# Altium PCB AudioMoth-v1.2.PcbDoc (part 4 of 4)
Units mil, origin at the board's own origin, x right, y up, seen from the top; angles counter-clockwise.
Board outline 4924.42 x 1891.72 mil, 4 copper layers (Top Layer, Layer 1, Layer 2, Bottom Layer), stack 61.651 mil thick; 148 components, 140 nets, 637 pads, 349 vias.
Unrouted connection lines stored in the file: 32.
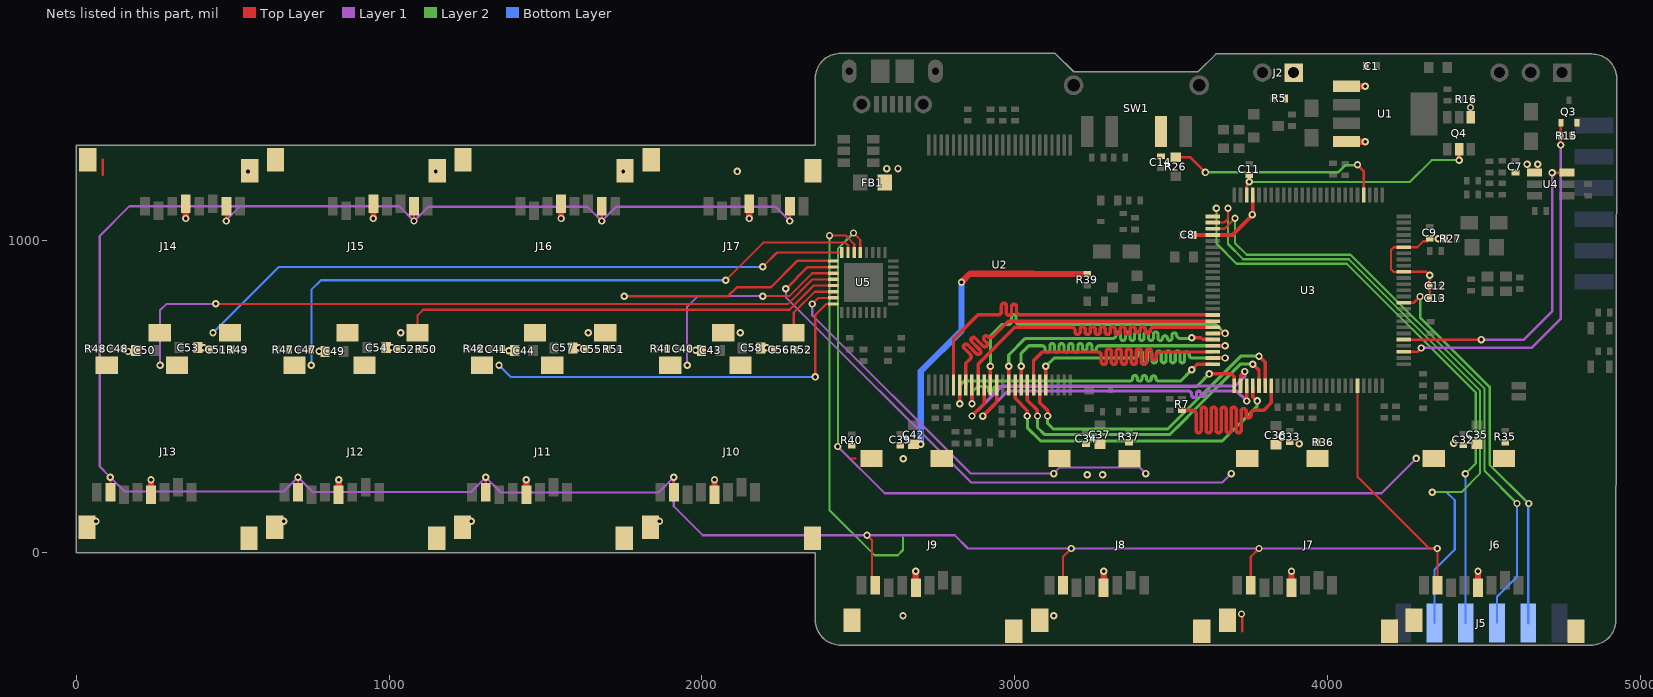
[diagram p5: the nets of this part, all layers, seen from the top]

## Via types
v1: diameter 23.62, hole 11.81, Top Layer to Bottom Layer, tented both sides, 344 vias
v2: diameter 23.62, hole 11.81, Top Layer to Bottom Layer, 5 vias

## Nets (pads, with @x,y where several pads share a name; then routed paths per layer and width w, separated by ;. In a path a pad name is that pad's centre, name@x,y a point inside that pad or via, vN(x,y) a via of type N, cw(c..) or ccw(c..) an arc to the next point about the centre after c; other vN are vias at no path point) (continued)
SD-PWR: C32.2 C33.2 C34.2 C35.2 C36.2 C37.2 C39.2 C40.2 C41.2 C42.2 C43.2 C44.2 C47.2 C48.2 C49.2 C50.2 C51.2 C52.2 C53.2 C54.2 C55.2 C56.2 C57.2 C58.2 J6.4 J7.4 J8.4 J9.4 J10.4 J11.4 J12.4 J13.4 J14.4 J15.4 J16.4 J17.4 R39.1 | length 1645.8
  Top Layer w20: J13.4@238.63,181.27 J13.4@238.63,186.5 v1(238.63,234.41) ; v1(349.68,1069.2) J14.4@349.68,1117.12 J14.4@349.68,1122.35 ; J12.4@838.63,181.27 J12.4@838.63,186.5 v1(838.63,234.41) ; v1(949.68,1069.2) J15.4@949.68,1117.12 J15.4@949.68,1122.35 ; J11.4@1438.63,180.59 1438.63,181.27 J11.4@1438.63,186.5 v1(1438.63,234.41) ; v1(1549.68,1069.2) J16.4@1549.68,1117.12 J16.4@1549.68,1122.35 ; J10.4@2040.08,180.59 2040.08,181.27 J10.4@2040.08,186.5 v1(2040.08,234.41) ; v1(2151.14,1069.2) J17.4@2151.14,1117.12 J17.4@2151.14,1122.35 ; C42.2@2676.87,347.78 v1@2699.03,347.78 ; J9.4@2683.87,-111.1 v1(2683.87,-57.95) ; v1(2829.9,865.31) 2856.9,892.31 3059.44,892.31 ; 3059.67,892.08 R39.1@3232.04,892.08 ; J8.4@3284.3,-111.1 v1(3284.3,-57.95) ; J7.4@3884.74,-111.1 v1(3884.74,-57.95) ; J6.4@4481.2,-111.1 v1(4481.2,-57.95)
  Bottom Layer w20: v1@2699.91,347.78 2699.91,580.7 2829.9,710.69 v1(2829.9,865.31)
  other v1: 3231.44,250.31 3280.9,250.31 2700.03,347.78 3910.02,349.24 4403.9,351.31 165.74,644.19 775.87,644.78 1382.18,646.94 1979.64,647.94 1606.14,655.78 2207.59,655.77 407.38,656.39 1009.19,656.78
SD_CD_1: J6.9 J6.10 R35.2 U5.13 | length 2731.6
  Top Layer w7: v1(2484.6,1022.88) 2506.4,1001.07 U5.13@2506.4,960.65
  Layer 1 w7: v1(2434.66,340.42) 2584.08,191 4172.63,191 v1(4283.91,302.29)
  Layer 2 w7: v1(2434.66,340.42) 2434.66,972.94 v1(2484.6,1022.88)
SD_CD_2: J9.9 J9.10 R40.2 U5.14 | length 1351
  Top Layer w7: v1(2408,1014.73) 2459.48,1014.73 2486.72,987.49 U5.14@2486.72,960.65 ; 2478.87,302.29 2491.37,302.29
  Layer 2 w7: v1(2408,1014.73) 2408,137.02 2552.45,-7.43 2626.22,-7.43 2642.86,9.21 2642.86,51.54
  other v1: 2642.85,-200.4 2643.86,300.82
SD_CD_3: J12.9 J12.10 R47.2 U5.15 | length 2045.9
  Top Layer w7: v1(2076.29,872.16) 2196.32,992.19 2458.02,992.19 2466.75,983.46 2466.75,960.93 U5.15@2467.03,960.65
  Bottom Layer w7: v1(751.31,599.88) 751.31,841.31 782.16,872.16 v1(2076.29,872.16)
  other v1: 662.75,101.23
SD_CD_4: J14.9 J14.10 R49.2 U5.16 | length 2164.3
  Top Layer w7: v1(2194.29,914.64) 2240.31,960.65 U5.16@2447.35,960.65
  Top Layer w8: 83.87,1256.88 84.87,1255.88 84.87,1209.78
  Bottom Layer w7: v1(437,703.73) 647.9,914.64 v1(2194.29,914.64)
  other v1: 548.9,1219.84
SD_CD_5: J16.9 J16.10 R51.2 U5.17 | length 724.4
  Top Layer w8: v1(1751.27,821.19) 2084,821.19 2112.43,849.63 2220.4,849.63 2304.46,933.68 U5.17@2429.09,933.68
  other v1: 1637,703.73 1748.9,1219.84
SD_CD_6: J7.9 J7.10 R36.2 U5.18 | length 1945.7
  Top Layer w8: v1(2268.45,844.51) 2337.93,914 U5.18@2420.38,914 ; v1@3725.87,-195.22 v1(3724.87,-195.22) 3727.26,-197.62 3727.26,-250.86
  Layer 1 w7: v1(2268.45,844.51) 2268.45,817.75 2860.43,225.78 3664.24,225.78 v1(3692.24,253.78)
SD_CD_7: J10.9 J10.10 R41.2 U5.19 | length 699.2
  Top Layer w7: v1(2194.29,821.19) 2279.35,821.19 2352.47,894.31 U5.19@2420.38,894.31
  Layer 1 w7: v1(1952.77,599.88) 1952.77,787.02 1986.94,821.19 v1(2194.29,821.19)
  other v1: 1864.21,101.23
SD_CD_8: J13.9 J13.10 R48.2 U5.20 | length 2369.4
  Top Layer w7: v1(445.87,796.47) 2275.5,796.47 2353.65,874.63 U5.20@2420.38,874.63
  Layer 1 w7: v1(267.68,599.88) 267.68,775.58 288.56,796.47 v1(445.87,796.47)
  other v1: 62.75,101.23
SD_CD_9: J15.9 J15.10 R50.2 U5.21 | length 1424.9
  Top Layer w7: J15.10@1091.02,703.73 1091.02,759.93 1108.87,777.78 2279.96,777.78 2357.13,854.94 U5.21@2420.38,854.94
  other v1: 1037,703.73 1148.9,1219.84
SD_CD_10: J17.9 J17.10 R52.2 U5.22 | length 226.3
  Top Layer w7: J17.10@2293.7,696.6 2293.7,768.6 2360.36,835.26 U5.22@2420.38,835.26
  other v1: 2122.09,703.73 2112.9,1219.84
SD_CD_11: J8.9 J8.10 R37.2 U5.23 | length 1403.1
  Top Layer w7: v1(2352.91,795.89) 2372.6,815.57 U5.23@2420.38,815.57
  Layer 1 w7: v1(2352.91,795.89) 2352.91,760.29 2859.43,253.78 v1(3124.43,253.78) 3144.28,273.62 3398.69,273.62 v1(3418.54,253.78)
  other v1: 3124.43,-200.4
SD_CD_12: J11.9 J11.10 R42.2 U5.24 | length 1297.2
  Top Layer w7: v1(2362.19,562.78) 2362.19,761.09 2396.98,795.89 U5.24@2420.38,795.89
  Bottom Layer w7: v1(1351.31,599.88) 1388.42,562.78 v1(2362.19,562.78)
  other v1: 1262.75,101.23
SD_CPU_MISO: J6.7 J7.7 J8.7 J9.7 J10.7 J11.7 J12.7 J13.7 J14.7 J15.7 J16.7 J17.7 U3.21 | length 9277.3
  Top Layer w7: J13.7@108.71,194.37 v1(108.71,242.29) ; v1(479.6,1061.32) J14.7@479.6,1109.24 ; J12.7@708.71,194.37 v1(708.71,242.29) ; v1(1079.6,1061.32) J15.7@1079.6,1109.24 ; J11.7@1308.71,194.37 v1(1308.71,242.29) ; v1(1679.6,1061.32) J16.7@1679.6,1109.24 ; J10.7@1910.16,194.37 v1(1910.16,242.29) ; v1(2281.06,1061.32) J17.7@2281.06,1109.24 ; v1(2527.9,56.78) 2543.28,41.39 2543.28,-92.56 J9.7@2553.95,-103.22 ; J8.7@3154.38,-103.22 3154.38,-11.74 v1@3186.28,20.16 ; J7.7@3754.82,-103.22 3754.82,-11.77 v1(3780.9,14.31) ; U3.21@4095.96,534.6 4095.96,243.32 4324.98,14.31 v1(4351.28,14.31) J6.7@4351.28,-103.22
  Layer 1 w7: v1(479.6,1061.32) 479.6,1064.24 523.94,1108.57 ; v1(2281.06,1061.32) 2235.27,1107.12 1725.4,1107.12 v1(1679.6,1061.32) 1633.81,1107.12 1125.4,1107.12 v1(1079.6,1061.32) 1032.35,1108.57 523.94,1108.57 ; v1@4349.28,14.31 v1(3780.9,14.31) v1(3180.43,14.31) 2850.47,14.31 2808,56.78 v1(2527.9,56.78) 2002.47,56.78 1910.16,149.09 v1(1910.16,242.29) 1861.46,193.58 1357.41,193.58 v1(1308.71,242.29) 1261.46,195.04 755.96,195.04 v1(708.71,242.29) 662.91,196.49 154.5,196.49 v1(108.71,242.29) 74.66,276.34 74.66,1013.66 169.57,1108.57 523.94,1108.57
SRAM_CPU_D0: U2.29 U3.92 | length 1124.2
  Top Layer w11: U2.29@2804.23,536.92 2804.23,682.64 2882.57,760.98 2941.13,760.98 2946.63,760.98 ccw(c2946.63,771.98) 2957.63,771.98 2957.63,790.49 cw(c2965.63,790.49) 2973.63,790.49 2973.63,767.29 ccw(c2981.63,767.29) 2989.63,767.29 2989.63,787.26 cw(c2997.63,787.26) 3005.63,787.26 3005.63,771.98 ccw(c3016.63,771.98) 3016.63,760.98 3065.65,760.98 U3.92@3633.37,760.98
SRAM_CPU_D1: U2.31 U3.93 | length 1124.2
  Top Layer w11: U2.31@2843.6,536.92 2843.6,606.13 2853.4,615.93 2857.29,619.82 ccw(c2849.51,627.6) 2857.29,635.38 2838.37,654.3 cw(c2844.02,659.96) 2838.37,665.62 cw(c2844.02,659.96) 2849.68,665.62 2877.8,637.5 ccw(c2883.45,643.16) 2889.11,637.5 ccw(c2883.45,643.16) 2889.11,648.81 2862.41,675.51 cw(c2868.07,681.17) 2862.41,686.82 cw(c2868.07,681.17) 2873.73,686.82 2899.01,661.54 ccw(c2904.67,667.2) 2910.32,661.54 ccw(c2904.67,667.2) 2910.32,672.85 2902.54,680.63 cw(c2908.2,686.29) 2902.54,691.95 cw(c2908.2,686.29) 2913.86,691.95 ccw(c2921.64,699.72) 2929.42,691.95 2967.77,730.31 2978.76,741.29 U3.93@3633.37,741.29
SRAM_CPU_D2: U2.33 U3.94 | length 1124.2
  Top Layer w11: U2.33@2882.97,536.92 2882.97,604.16 3000.42,721.61 3160.61,721.61 3182.11,721.61 cw(c3182.11,710.61) 3193.11,710.61 3193.11,706.59 ccw(c3201.11,706.59) 3209.11,706.59 3209.11,715.29 cw(c3217.11,715.29) 3225.11,715.29 3225.11,706.59 ccw(c3233.11,706.59) 3241.11,706.59 3241.11,715.29 cw(c3249.11,715.29) 3257.11,715.29 3257.11,706.59 ccw(c3265.11,706.59) 3273.11,706.59 3273.11,715.29 cw(c3281.11,715.29) 3289.11,715.29 3289.11,706.59 ccw(c3297.11,706.59) 3305.11,706.59 3305.11,715.29 cw(c3313.11,715.29) 3321.11,715.29 3321.11,706.59 ccw(c3329.11,706.59) 3337.11,706.59 3337.11,715.29 cw(c3345.11,715.29) 3353.11,715.29 3353.11,706.59 ccw(c3361.11,706.59) 3369.11,706.59 3369.11,715.29 cw(c3377.11,715.29) 3385.11,715.29 3385.11,713.33 ccw(c3393.11,713.33) 3401.11,713.33 3401.11,715.29 cw(c3409.11,715.29) 3417.11,715.29 3417.11,710.61 ccw(c3425.11,710.61) 3433.11,710.61 cw(c3444.11,710.61) 3444.11,721.61 3538.36,721.61 U3.94@3633.37,721.61
SRAM_CPU_D3: U2.35 U3.95 | length 1022.2
  Top Layer w11: U2.35@2922.34,536.92 v1(2922.34,596.5) ; U3.95@3633.37,701.92 v1(3672.51,701.92)
  Layer 2 w9.9: v1(2922.34,596.5) 2922.34,694.84 2957.8,730.31 2974.91,730.31 2979.86,730.31 ccw(c2979.86,740.21) 2989.76,740.21 2989.76,754.57 cw(c2997.21,754.57) 3004.66,754.57 3004.66,740.21 ccw(c3014.56,740.21) 3014.56,730.31 3054.46,730.31 3644.13,730.31 v1(3672.51,701.92)
SRAM_CPU_D4: U2.38 U3.96 | length 1019.2
  Top Layer w11: U2.38@2981.4,536.92 v1(2981.4,596.5) ; v1(3565.9,688.14) 3595.21,688.14 3600.71,682.64 3632.96,682.64 U3.96@3633.37,682.24
  Layer 2 w9.9: v1@2980.9,596.5 2980.9,633.04 3034.17,686.31 3309.08,686.31 3314.03,686.31 ccw(c3314.03,696.21) 3323.93,696.21 3323.93,699.25 cw(c3331.38,699.25) 3338.83,699.25 3338.83,686.9 ccw(c3346.28,686.9) 3353.73,686.9 3353.73,699.25 cw(c3361.18,699.25) 3368.63,699.25 3368.63,686.9 ccw(c3376.08,686.9) 3383.53,686.9 3383.53,699.25 cw(c3390.98,699.25) 3398.43,699.25 3398.43,686.9 ccw(c3405.88,686.9) 3413.33,686.9 3413.33,699.25 cw(c3420.78,699.25) 3428.23,699.25 3428.23,686.9 ccw(c3435.68,686.9) 3443.13,686.9 3443.13,699.22 cw(c3450.58,699.22) 3458.03,699.22 3458.03,686.9 ccw(c3465.48,686.9) 3472.93,686.9 cw(c3480.38,686.9) 3487.83,686.9 ccw(c3495.28,686.9) 3502.73,686.9 3502.73,696.21 cw(c3510.18,696.21) 3517.63,696.21 ccw(c3527.53,696.21) 3527.53,686.31 3556.75,686.31 3564.07,686.31 v1(3565.9,688.14)
SRAM_CPU_D5: U2.40 U3.97 | length 1022.2
  Top Layer w11: U2.40@3020.77,536.92 v1(3020.77,596.5) ; U3.97@3633.37,662.55 v1(3672.51,662.55)
  Layer 2 w9.9: v1@3020.72,596.5 3020.72,638.22 3045.05,662.55 3067.7,662.55 3087.55,662.55 cw(c3087.55,652.65) 3097.45,652.65 3097.45,649.35 ccw(c3104.9,649.35) 3112.35,649.35 3112.35,661.96 cw(c3119.8,661.96) 3127.25,661.96 3127.25,649.35 ccw(c3134.7,649.35) 3142.15,649.35 3142.15,661.96 cw(c3149.6,661.96) 3157.05,661.96 3157.05,649.35 ccw(c3164.5,649.35) 3171.95,649.35 3171.95,661.96 cw(c3179.4,661.96) 3186.85,661.96 3186.85,649.35 ccw(c3194.3,649.35) 3201.75,649.35 3201.75,661.96 cw(c3209.2,661.96) 3216.65,661.96 3216.65,654.92 ccw(c3224.1,654.92) 3231.55,654.92 3231.55,661.96 cw(c3239,661.96) 3246.45,661.96 3246.45,652.65 ccw(c3253.9,652.65) 3261.35,652.65 cw(c3271.25,652.65) 3271.25,662.55 3324.77,662.55 v1(3672.51,662.55)
SRAM_CPU_D6: U2.42 U3.98 | length 1124.4
  Top Layer w11: U2.42@3060.14,536.92 3060.14,614.55 3088.05,642.46 3244.54,642.46 3266.04,642.46 cw(c3266.04,631.46) 3277.04,631.46 3277.04,610.74 ccw(c3285.04,610.74) 3293.04,610.74 3293.04,644.46 cw(c3301.04,644.46) 3309.04,644.46 3309.04,610.74 ccw(c3317.04,610.74) 3325.04,610.74 3325.04,644.46 cw(c3333.04,644.46) 3341.04,644.46 3341.04,610.74 ccw(c3349.04,610.74) 3357.04,610.74 3357.04,644.46 cw(c3365.04,644.46) 3373.04,644.46 3373.04,610.74 ccw(c3381.04,610.74) 3389.04,610.74 3389.04,644.46 cw(c3397.04,644.46) 3405.04,644.46 3405.04,610.74 ccw(c3413.04,610.74) 3421.04,610.74 3421.04,644.46 cw(c3429.04,644.46) 3437.04,644.46 3437.04,625.69 ccw(c3445.04,625.69) 3453.04,625.69 3453.04,631.46 cw(c3464.04,631.46) 3464.04,642.46 3624.21,642.46 3632.96,642.46 U3.98@3633.37,642.87
SRAM_CPU_D7: U2.44 U3.99 | length 1022.2
  Top Layer w11: U2.44@3099.51,536.92 v1(3099.51,596.5) ; U3.99@3633.37,623.18 v1(3672.51,623.18)
  Layer 2 w9.9: v1(3099.51,596.5) 3126.2,623.18 3379.12,623.18 3384.08,623.18 ccw(c3384.08,633.08) 3393.98,633.08 3393.98,638.2 cw(c3401.43,638.2) 3408.88,638.2 3408.88,615.28 ccw(c3416.33,615.28) 3423.78,615.28 3423.78,638.2 cw(c3431.23,638.2) 3438.68,638.2 3438.68,615.28 ccw(c3446.13,615.28) 3453.58,615.28 3453.58,638.2 cw(c3461.03,638.2) 3468.48,638.2 3468.48,615.28 ccw(c3475.93,615.28) 3483.38,615.28 3483.38,638.2 cw(c3490.83,638.2) 3498.28,638.2 3498.28,615.28 ccw(c3505.73,615.28) 3513.18,615.28 3513.18,638.2 cw(c3520.63,638.2) 3528.08,638.2 3528.08,615.28 ccw(c3535.53,615.28) 3542.98,615.28 3542.98,635.79 cw(c3550.43,635.79) 3557.88,635.79 3557.88,633.08 ccw(c3567.78,633.08) 3567.78,623.18 3662.3,623.18 v1(3672.51,623.18)
SRAM_CPU_D8: U2.30 U3.100 | length 1022.2
  Top Layer w11: v1(2823.92,477.35) U2.30@2823.92,536.92 ; v1(3565.9,585.31) 3565.9,586.31 3583.09,603.5 U3.100@3633.37,603.5
  Layer 2 w9.9: v1(2823.92,477.35) 2823.92,535.14 2837.98,549.19 2843.6,549.19 2922.34,549.19 3362.07,549.19 3367.02,549.19 ccw(c3367.02,559.09) 3376.92,559.09 3376.92,559.98 cw(c3384.37,559.98) 3391.82,559.98 3391.82,556.64 ccw(c3399.27,556.64) 3406.72,556.64 3406.72,559.65 cw(c3414.17,559.65) 3421.62,559.65 3421.62,556.64 ccw(c3429.07,556.64) 3436.52,556.64 3436.52,559.09 cw(c3443.97,559.09) 3451.42,559.09 ccw(c3461.32,559.09) 3461.32,549.19 3510.18,549.19 3529.78,549.19 v1(3565.9,585.31)
SRAM_CPU_D9: U2.32 U3.1 | length 1023.3
  Top Layer w11: v1(2863.29,477.35) U2.32@2863.29,536.92 ; v1(3622.05,572.46) 3692.61,572.46 3702.26,562.81 U3.1@3702.26,534.6
  Layer 2 w9.9: v1(2863.29,477.35) 2863.29,514.56 2881.02,532.29 2886.88,532.29 2906.73,532.29 cw(c2906.73,522.39) 2916.63,522.39 2916.63,518.91 ccw(c2924.08,518.91) 2931.53,518.91 2931.53,522.39 cw(c2941.43,522.39) 2941.43,532.29 2967.19,532.29 3581.88,532.29 v1@3625.31,575.72
SRAM_CPU_D10: U2.34 U3.2 | length 1107.2
  Top Layer w11: v1(2863.29,437.89) 2902.66,477.26 U2.34@2902.66,536.92 ; U3.2@3721.95,534.6 3721.95,566.33 v1(3735.73,580.11)
  Layer 1 w9.9: v1(2863.29,437.89) 2897.41,472.01 2958.68,533.29 2959.68,534.28 3705.77,534.28 3735.73,564.25 v1(3735.73,580.11)
SRAM_CPU_D11: U2.36 U3.3 | length 1105.7
  Top Layer w11: v1(2897.41,437.63) 2897.15,437.89 2942.03,482.78 U2.36@2942.03,536.92 ; v1(3741.4,485.92) 3741.52,486.03 3741.52,534.48 U3.3@3741.63,534.6
  Layer 1 w9.9: v1(2897.41,437.63) 2977.16,517.38 3536.06,517.38 3555.91,517.38 cw(c3555.91,507.48) 3565.81,507.48 3565.81,504.01 ccw(c3573.26,504.01) 3580.71,504.01 3580.71,509.93 cw(c3588.16,509.93) 3595.61,509.93 3595.61,507.48 ccw(c3603.06,507.48) 3610.51,507.48 cw(c3620.41,507.48) 3620.41,517.38 3689.9,517.38 3710.33,517.38 3741.4,486.31 v1(3741.4,485.92)
SRAM_CPU_D12: U2.39 U3.4 | length 1022.2
  Top Layer w11: U2.39@3001.08,536.92 3001.08,494.48 3040.45,455.11 v1(3040.45,437.89) ; U3.4@3761.32,534.6 3761.32,499.86 v1(3775.1,486.08)
  Layer 2 w9.9: v1(3040.45,437.89) 3040.45,400.19 3082.33,358.31 3664.45,358.31 3775.1,468.96 v1(3775.1,486.08)
SRAM_CPU_D13: U2.41 U3.5 | length 1016.9
  Top Layer w11: U2.41@3040.45,536.92 3040.45,488.2 3072.74,455.92 v1(3072.74,437.89) ; v1(3761.32,603.5) 3781,583.81 U3.5@3781,534.6
  Layer 2 w9.9: v1(3072.74,437.89) 3072.74,401.38 3094.8,379.31 3496.5,379.31 3535.13,417.93 3572.75,455.56 3721.07,603.87 3760.94,603.87 v1(3761.32,603.5)
SRAM_CPU_D14: U2.43 U3.6 | length 1015.3
  Top Layer w11: U2.43@3079.82,536.92 3079.82,480.61 3105.02,455.41 v1(3105.02,437.89) ; v1(3780.99,629.24) 3780.99,628.79 3800.69,609.09 U3.6@3800.69,534.6
  Layer 2 w9.9: v1(3105.02,437.89) 3105.02,414.35 3122.59,396.78 3490.07,396.78 3722.53,629.24 v1(3780.99,629.24)
SRAM_CPU_D15: R7.1 U3.7 | length 1124.2
  Top Layer w11: R7.1@3534.9,456.31 3547.25,456.31 3568.75,456.31 cw(c3568.75,445.31) 3579.75,445.31 3579.75,392.28 ccw(c3587.75,392.28) 3595.75,392.28 3595.75,458.31 cw(c3603.75,458.31) 3611.75,458.31 3611.75,392.28 ccw(c3619.75,392.28) 3627.75,392.28 3627.75,458.31 cw(c3635.75,458.31) 3643.75,458.31 3643.75,392.28 ccw(c3651.75,392.28) 3659.75,392.28 3659.75,458.31 cw(c3667.75,458.31) 3675.75,458.31 3675.75,392.28 ccw(c3683.75,392.28) 3691.75,392.28 3691.75,458.31 cw(c3699.75,458.31) 3707.75,458.31 3707.75,392.28 ccw(c3715.75,392.28) 3723.75,392.28 3723.75,453.61 cw(c3731.75,453.61) 3739.75,453.61 3739.75,440.16 ccw(c3747.75,440.16) 3755.75,440.16 3755.75,445.31 cw(c3766.75,445.31) 3766.75,456.31 3796.86,456.31 3820.37,479.83 U3.7@3820.37,534.6
SWCLK: J5.3 U3.76 | length 1889.9
  Layer 2 w7: v1(3644.9,1101.72) 3644.9,989.31 3709.33,924.87 4061.92,924.87 4473.9,512.9 4473.9,286.31 v1(4440.9,253.31)
  Bottom Layer w7: v1(4440.9,253.31) 4440.9,-223.25 J5.3@4441.87,-224.22
SWDIO: J5.2 U3.77 | length 2145.5
  Top Layer w7: U3.77@3633.37,1056.25 3669.84,1056.25 3681.87,1068.28 v1(3681.87,1101.72)
  Layer 2 w7: v1(3681.87,1101.72) 3681.87,987.87 3730.87,938.87 4067.72,938.87 4487.9,518.69 4487.9,254.4 4428.12,194.62 4335.83,194.62 v1(4334.9,194.62)
  Bottom Layer w7: v1(4334.9,194.62) 4380.59,194.62 4406.84,168.36 4406.84,11.25 4341.87,-53.72 J5.2@4341.87,-224.22
SWI_CPU_RST: J5.5 U3.36 | length 1249.8
  Top Layer w8: U3.36@4243.15,800.8 U3.36@4243.6,800.35 4276.21,800.35 v1(4295.89,820.03)
  Layer 2 w8: v1(4295.89,820.03) 4295.89,753.31 4518.03,531.18 4518.03,282.15 v1@4642.38,157.79
  Bottom Layer w8: J5.5@4641.87,-224.22 4641.87,157.28 v1(4642.9,158.31)
SWO: J5.4 U3.78 | length 1973.6
  Top Layer w7: U3.78@3633.37,1036.57 3670.72,1036.57 v1(3704.18,1070.03)
  Layer 2 w7: v1(3704.18,1070.03) 3704.18,990.44 3741.41,953.21 4073.66,953.21 4502.24,524.63 4502.24,261.97 v1(4605.9,158.31)
  Bottom Layer w7: J5.4@4541.87,-224.22 4541.87,-140.38 4605.9,-76.35 v1(4605.9,158.31)
USB_ENABLE: C14.2 R26.2 SW1.2 U3.54 | length 715.2
  Top Layer w8: R26.2@3514.87,1264.81 3561.58,1264.81 v1(3609.74,1216.64) ; v1(4095.96,1240.83) 4115.65,1221.15 U3.54@4115.65,1144.84
  Layer 2 w8: v1(3609.74,1216.64) 4033.74,1216.64 4056.87,1239.78 4094.91,1239.78 v1(4095.96,1240.83)
VBAT: C1.2 J2.1 R5.2 U1.1 U1.4 | length 120.3
  Top Layer w20: U1.4@4060.46,1314.9 v1(4120.59,1314.9) ; U1.1@4060.46,1492.06 v1(4120.59,1492.06)
VBUS: C8.2 FB1.1 Q4.1 R16.1 U3.72 U3.79 | length 279.8
  Top Layer w12: C8.2@3571.4,1016.89 U3.79@3633.37,1016.88 3696.36,1016.88 3761.32,1081.84 U3.72@3761.32,1144.84
  other v1: 3759.32,1081.84 2591.31,1228.95 2626.75,1228.95 4457.15,1424.35
VDD: C7.2 C9.2 C12.2 C13.2 Q3.2 R15.1 R27.2 U3.41 U3.45 U4.4 | length 407.2
  Top Layer w7: U3.41@4243.6,898.77 4211.07,898.77 4202.7,907.14 4202.7,968.57 4211.65,977.51 U3.45@4243.6,977.51
  Top Layer w8: U3.41@4243.6,898.77 4315.77,898.77 v1(4327,887.54) ; U3.45@4243.6,977.51 4286.88,977.51 4305.99,996.62 4318.55,996.62 C9.2@4327,1005.07 ; C13.2@4327,814.94 C12.2@4327,854.31 v1@4327,888.89
  other v1: 4354.6,1005.07 4637.99,1242.78 4672.33,1242.78
VMIC_EN_N: Q3.1 R15.2 U3.28 | length 1172.7
  Top Layer w8: U3.28@4243.6,642.87 4287.46,642.87 v1(4299.92,655.32) ; v1(4746.02,1304.31) R15.2@4746.02,1334.11 Q3.1@4746.02,1375.55
  Layer 1 w8: v1(4299.92,655.32) 4651.92,655.32 4746.02,749.43 v1(4746.02,1304.31)
VREF_EN: U3.30 U4.3 | length 1002.2
  Top Layer w8: U3.30@4243.6,682.24 v1(4491.92,682.24) ; v1(4717.9,1215.31) 4718.97,1216.38 U4.3@4765.15,1216.38
  Layer 1 w8: v1(4491.92,682.24) 4627.61,682.24 4717.9,772.52 v1(4717.9,1215.31)
VREGO: C11.2 Q4.5 U3.73 | length 801.8
  Top Layer w8: U3.73@3741.63,1144.84 3741.63,1174.04 v1@3751.9,1184.31 ; C11.2@3747.54,1207.81 3749.79,1205.55 v1(3749.79,1186.41)
  Top Layer w12: v1(4420.62,1255.22) Q4.5@4420.62,1291
  Layer 2 w7: v1(3749.79,1186.41) 4263.77,1186.41 4333.32,1255.96 4419.88,1255.96 v1(4420.62,1255.22)
pads on no net: D1.3 D1.4 J3.4 J3.SH1 J3.SH2 J3.SH3 J3.SH4 J3.SH5 J3.SH6 J6.1 J6.8 J7.1 J7.8 J8.1 J8.8 J9.1 J9.8 J10.1 J10.8 J11.1 J11.8 J12.1 J12.8 J13.1 J13.8 J14.1 J14.8 J15.1 J15.8 J16.1 J16.8 J17.1 J17.8 SW1.4 SW1.5 SW1.6 U1.2 U2.10 U2.13 U3.80 X1.2 X1.3

## Polygon pours and split planes (outlines as drawn)
3V on Layer 2 "3V_L03_P024" (solid, remove dead copper, pour order 24): 2362.1,411 2663.45,411 2663.45,470.08 3020.72,470.08 3020.72,327.24 3820.37,327.24 3820.37,507.21 4316.08,507.21 4316.08,850.59 4717.9,850.59 4717.9,1294.95 4521.62,1294.95 4521.62,1595.27 4844.78,1595.27 cw(c4844.79,1518.87) 4921.18,1518.87 4921.18,-217.72 cw(c4844.42,-217.73) 4844.42,-294.49 2444.5,-294.49 cw(c2444.49,-212.1) 2362.1,-212.09 2362.1,0 0.4,0 0.4,1294.95 2352.91,1294.95 2352.91,604.75 2105.9,604.75 2105.9,204 2362.1,204
GND on Layer 2 "GND_L03_P025" (solid, remove dead copper, pour order 25): 0.4,0 2362.61,0 2362.61,-215.75 ccw(c2442.92,-214.17) 2444.5,-294.49 4841.65,-294.49 ccw(c4843.03,-216.34) 4921.18,-217.72 4924.31,1518.5 ccw(c4846.16,1517.12) 4844.78,1595.27 3643.32,1595.27 3586.23,1538.18 3188.59,1538.18 3129.53,1597.24 2443.99,1597.24 ccw(c2442.42,1516.92) 2362.1,1518.5 2362.1,1302.76 -0.1,1302.76
VBUS on Layer 2 "VBUS_L03_P020" (solid, remove dead copper, pour order 20): 4512,1069.27 3727.85,1069.27 3727.85,1409.31 2763.53,1409.31 2763.53,1149.31 2362.1,1149.31 2362.1,1518.5 cw(c2440.84,1518.5) 2440.84,1597.24 2455.49,1597.24 3129.53,1597.24 3188.59,1538.18 3586.23,1538.18 3643.32,1595.27 4512,1595.27
VDD on Layer 2 "VDD_L03_P014" (solid, remove dead copper, pour order 14): 4316.08,870.31 4316.08,1054.45 4521.62,1054.45 4521.62,1274.31 4694.81,1274.31 4694.81,870.31
NetD1_5 on Top Layer "NETD1_5_L01_P026" (solid, pour order 26): 2677.93,1349.91 2677.93,1461.41 2652.34,1461.41 2652.34,1372.1 2579.51,1299.27 2539.89,1299.27 2494.74,1299.27 2482.28,1286.81 2482.28,1158.12 2526.54,1158.12 2526.54,1210.09 2514.18,1222.46 2514.18,1260.82 2525.07,1271.71 2599.73,1271.71
GND on Top Layer "GND_L01_P022" (solid, remove dead copper, pour order 22): 4922.92,742.84 4922.92,755.07 4141.24,755.07 4141.24,1271.31 4481.62,1271.31 4481.62,1491.72 4338.09,1491.72 4338.09,1595.27 3643.32,1595.27 3586.23,1538.18 3188.59,1538.18 3129.53,1597.24 2443.99,1597.24 ccw(c2442.41,1516.92) 2362.1,1518.5 2362.1,1302.76 -0.1,1302.76 0.4,0 2362.61,0 2362.61,-215.75 ccw(c2442.92,-214.17) 2444.5,-294.49 4841.65,-294.49 ccw(c4843.03,-216.34) 4921.18,-217.72
AGND on Top Layer "AGND_L01_P019" (solid, remove dead copper, pour order 19): 4499.34,1275.76 4466.36,1242.78 4396.51,1242.78 4370.85,1217.12 4180.64,1217.12 4168.8,1204.9 4168.8,1119.43 4185.9,1102.33 4185.9,1025 4345.09,1025 4345.09,772.31 4916.73,772.31 4916.73,1522.76 ccw(c4837.23,1522.76) 4837.22,1602.27 4350.34,1602.27 4350.34,1519.31 4499.34,1519.31
3V_SRAM on Top Layer "3V_SRAM_L01_P016" (solid, remove dead copper, pour order 16): 2967.22,570.38 2967.22,338.31 2912.16,338.31 2912.16,432.57 2956.2,476.6 2956.2,570.38
GND on Bottom Layer "GND_L04_P021" (solid, remove dead copper, pour order 21): 0.4,0 2362.61,0 2362.61,-215.75 ccw(c2442.92,-214.17) 2444.5,-294.49 4841.65,-294.49 ccw(c4843.03,-216.34) 4921.18,-217.72 4924.31,1518.5 ccw(c4846.16,1517.12) 4844.78,1595.27 3643.32,1595.27 3586.23,1538.18 3188.59,1538.18 3129.53,1597.24 2443.99,1597.24 ccw(c2442.42,1516.92) 2362.1,1518.5 2362.1,1302.76 -0.1,1302.76
SD-PWR on Bottom Layer "SD-PWR_L04_P015" (solid, remove dead copper, pour order 15): 3890.74,364 3807.84,281.09 2805.11,281.09 2691.35,394.85 2296.81,394.85 2296.81,1135.33 2296.58,1138.77 2296.58,1302.76 0.4,1302.76 0.4,0 2362.61,0 2362.61,-294.49 4636.9,-294.49 4636.9,364
3V on Bottom Layer "3V_L04_P017" (solid, remove dead copper, pour order 17): 3188.59,1538.18 3129.53,1597.24 2795.34,1597.24 2795.34,1396.91 3299.9,1396.91 3299.9,873.31 3645.67,873.31 3645.67,968.31 4245.99,968.31 4245.99,691 4922.97,691 4922.97,1595.34 3643.39,1595.34 3586.23,1538.18
GND on Layer 1 "GND_L02_P023" (solid, remove dead copper, pour order 23): 0.4,0 2362.61,0 2362.61,-215.75 ccw(c2442.92,-214.17) 2444.5,-294.49 4841.65,-294.49 ccw(c4843.03,-216.34) 4921.18,-217.72 4924.31,1518.5 ccw(c4846.16,1517.12) 4844.78,1595.27 3643.32,1595.27 3586.23,1538.18 3188.59,1538.18 3129.53,1597.24 2443.99,1597.24 ccw(c2442.42,1516.92) 2362.1,1518.5 2362.1,1302.76 -0.1,1302.76

## Other copper
Top Layer:
  rectangle net VDD: 4588.08,1203.88 4686.02,1225.38
  rectangle net 3V: 4444.24,1271.31 4471.74,1358.29
  rectangle net 3V: 4406.84,1329.81 4471.74,1358.29
  rectangle net 3V: 4406.84,1329.81 4434.4,1413.05
  rectangle net VBUS: 2578.4,1158.12 2628.27,1244.88
  rectangle net VBUS: 2575.58,1208.55 2642.56,1244.88
  rectangle net VBUS: 2561.04,1158.12 2628.27,1210.09
  rectangle net 3V: 4516.74,951.53 4590.35,1003.5
  region net CPU_USB#_D_N: 2473.24,1309.11 2473.24,1336.67 2433.87,1336.67 2433.87,1309.11
  rectangle net SD_CD_6: 3707.97,285.36 4003.24,317.15
  rectangle net SD_CD_2: 2497.41,285.36 2792.69,317.15
  rectangle net NetR12_2: 2798.1,341 2893.16,366
  rectangle net NetFB5_1: 3254.26,1051.56 3286.44,1142.52
  rectangle net NetFB2_2: 3172.74,407.78 3240.81,451.19
  rectangle net NetFB2_2: 3215.81,433.81 3254.06,474.81
  rectangle net INT_EXP: 2624.55,678.6 2649.55,723.02
  region net NetFB5_2: 3373,1142.52 3320.59,1142.52 3320.59,1110.78 3373,1110.78
  rectangle net 3V: 3329.74,1058.34 3396.9,1103.03
  rectangle net CPU_FET_SD_EN_N: 3362.33,787.78 3448.94,830.05
  rectangle net NetFB2_2: 2985.87,368.52 3202.87,394.52
  rectangle net MIC_CPU_DATA: 4614.9,1287.7 4694.26,1371.75
  rectangle net NetC6_1: 4612.91,1382.19 4694.26,1565.3
  rectangle net VDD: 4626.03,1236.88 4819.61,1268.31
  rectangle net NetLED2_1: 4892.82,576.09 4913.63,657.72
  rectangle net NetLED1_1: 4890.84,699.17 4911.66,780.81
  rectangle net VDD: 4311,992.57 4384.86,1017.57
  rectangle net NetFB3_1: 4426.36,950.51 4490.99,1003.5
  region net NetQ4_3: 4434.74,1435.72 4434.74,1463.22 4370.72,1463.22 4370.72,1435.72
  region net NetQ4_3: 4399.22,1373.67 4399.22,1464.22 4369.44,1464.22 4369.44,1373.67
  region net VBUS: 4471.74,1373.67 4471.74,1464.22 4444.24,1464.22 4444.24,1373.67
  region net HFXTAL_CPU_CLK_P: 4441.68,852.81 4441.68,820.97 4531.29,820.97 4531.29,852.81
  region net GND: 4441.68,909 4441.68,866.69 4531.29,866.69 4531.29,909
  rectangle net SWCLK: 3609.74,1070.03 3656.99,1121.21
  rectangle net VDD: 4626.03,1203.88 4686.02,1268.31
  region net GND: 4550.98,852.81 4550.98,820.97 4627.27,820.97 4627.27,852.81
  region net HFXTAL_CPU_CLK_N: 4550.98,899.71 4550.98,866.69 4631.87,866.69 4631.87,899.71
  rectangle net NetFB2_2: 3172.74,368.52 3202.87,451.19
  rectangle net 3V: 2462.87,370.28 2545.63,391.78
  rectangle net VBAT: 3845.96,1440.81 3873.46,1585.07
  rectangle net NetJ4_1: 4717.34,1432.51 4779.42,1565.3
  rectangle net VDD: 4774.02,1242.78 4819.61,1387.36
  rectangle net BAT_ACMP_V: 3803.49,1393.23 3899.37,1411.23
  rectangle net NetQ2_3: 3827.85,1349.09 3903.63,1381.37
  rectangle net VBAT: 3845.96,1474.34 4140.87,1585.07
  rectangle net SD_CD_1: 4766.87,-268.68 4826.87,329.84
  rectangle net SD_CD_7: 1870.96,593.27 1897.97,665.28
  region net SD_CD_5: 1716.87,711.28 1689.86,711.28 1689.86,639.27 1716.87,639.27
  rectangle net SD_CD_12: 1272.31,593.26 1299.33,665.28
  region net SD_CD_9: 1117.88,711.29 1090.87,711.29 1090.87,639.28 1117.88,639.28
  rectangle net SD_CD_3: 662.34,590.87 689.36,662.89
  region net SD_CD_4: 515.27,709.9 488.25,709.9 488.25,637.89 515.27,637.89
  rectangle net SD_CD_8: 61.86,593.17 88.87,665.19
  region net SD-PWR: 204.32,666.01 139.46,666.01 139.46,630.18 204.32,630.18
  rectangle net SD-PWR: 373.38,638.89 438.24,674.71
  region net SD-PWR: 809.87,663.1 742.22,663.1 742.22,627.28 809.87,627.28
  rectangle net SD-PWR: 975.19,639.28 1040.05,675.1
  region net SD-PWR: 1416.18,665.27 1351.32,665.27 1351.32,629.44 1416.18,629.44
  rectangle net SD-PWR: 1572.14,637.46 1636.99,673.28
  region net SD-PWR: 2013.64,665.44 1948.78,665.44 1948.78,629.62 2013.64,629.62
  rectangle net SD-PWR: 2173.59,637.45 2238.45,673.27
  rectangle net SD_CD_10: 2287.52,637.45 2308.37,690.98
  rectangle net SD_CD_9: 831.18,686.81 1126.45,718.6
  rectangle net SD_CD_4: 231.18,686.81 526.45,718.6
  rectangle net SD_CD_5: 1431.18,686.81 1726.45,718.6
  rectangle net SD_CD_10: 2032.64,686.81 2327.91,718.6
  rectangle net NetC45_2: 2456.35,634.6 2649.55,669.1
  region net SD_CD_1: 4826.87,329.84 4528.84,329.84 4528.84,274.73 4826.87,274.73
  rectangle net SD_CD_1: 4252.98,274.26 4575.9,325.78
  rectangle net SD_CD_6: 3661.31,242.75 3778.84,329.84
  region net SD_CD_6: 4034.54,329.84 3932.38,329.84 3932.38,242.75 4034.54,242.75
  region net SD_CD_11: 3449.47,329.84 3331.94,329.84 3331.94,242.75 3449.47,242.75
  rectangle net SD_CD_11: 3060.88,237.31 3178.4,329.84
  region net SD_CD_2: 2849.03,329.84 2731.51,329.84 2731.51,274.73 2849.03,274.73
  rectangle net SD_CD_8: 61.86,582.95 357.13,614.75
  rectangle net SD_CD_3: 661.86,582.95 957.13,614.75
  rectangle net SD_CD_12: 1261.86,582.95 1557.13,614.75
  rectangle net SD_CD_7: 1863.31,582.95 2158.59,614.75
  region net SD_CD_4: 581.57,1286.41 8.74,1286.41 8.74,1184.05 581.57,1184.05
  region net SD_CD_9: 1181.57,1286.41 608.74,1286.41 608.74,1184.05 1181.57,1184.05
  region net SD_CD_5: 1781.57,1286.41 1208.74,1286.41 1208.74,1184.05 1781.57,1184.05
  region net SD_CD_10: 2383.03,1286.41 1810.2,1286.41 1810.2,1184.05 2383.03,1184.05
  rectangle net SD_CD_7: 1808.2,17.2 2381.03,119.57
  rectangle net SD_CD_12: 1206.74,17.2 1779.57,119.57
  rectangle net SD_CD_3: 606.74,17.2 1179.57,119.57
  rectangle net SD_CD_8: 6.74,17.2 579.57,119.57
  rectangle net SD_CD_1: 4253.29,-280.39 4826.12,-178.03
  rectangle net SD_CD_6: 3652.85,-280.39 4225.69,-178.03
  rectangle net SD_CD_11: 3052.42,-280.39 3625.25,-178.03
  rectangle net SD_CD_2: 2451.98,-280.39 3024.81,-178.03
  rectangle net SD-PWR: 4387.11,335.28 4496.92,363.78
  rectangle net BAT_ACMP_V: 3803.49,1405.73 3836.46,1465.81
  rectangle net SD-PWR: 3817.65,331.24 3922.92,363.78
  rectangle net SD-PWR: 3212.31,237.31 3300.03,363.78
  rectangle net SD-PWR: 2618.01,329.78 2711.68,362.78
  rectangle net SD_CD_2: 2460.44,274.73 2491.37,351.28
  rectangle net SD_CD_2: 2460.44,274.73 2577.96,329.84
  rectangle net SD_CD_1: 4529.04,275.26 4580.75,371.78
  rectangle net SD_CD_1: 4532.81,274.26 4603.68,329.38
  rectangle net SD_CD_6: 3932.38,274.73 4003.24,329.84
  rectangle net SD_CD_6: 3932.58,274.73 3983.11,371.24
  rectangle net USB_ENABLE: 3448.11,1249.3 3489.19,1396.91
  rectangle net MODE: 3274.68,1249.3 3331.71,1401.77
  rectangle net USB_ENABLE: 3456.98,1249.81 3532.37,1279.81
  rectangle net NetFB2_1: 3222.56,506.31 3313.74,534.41
  rectangle net SD_CD_11: 3331.94,274.73 3402.81,362.28
  rectangle net 3V: 3323.59,381.28 3390.83,474.81
  rectangle net NetFB4_2: 3212.79,788.8 3244.54,865.31
  region net NetFB4_1: 3334.52,787.78 3334.52,864.92 3275.35,864.92 3275.35,787.78
  rectangle net 3V: 3345.1,839.66 3448.11,985.62
  pour cut-out: 4608,1573.35 4608,1271.04 4818,1271.04 4818,1573.35
  pour cut-out: 4420.62,1202.4 4420.62,1126.47 4466.14,1126.47 4466.14,1202.4
  pour cut-out: 4345.09,1085 4345.09,875.69 4590.35,875.69 4590.35,1085
  pour cut-out: 4644.37,909 4644.37,807.77 4387.11,807.77 4387.11,938.14 4644.37,938.14
Layer 1:
  rectangle net VBAT: 4101.86,1297.18 4143.05,1514.78
  pour cut-out: 4491.9,1588.31 4491.9,1470.31 4796.9,1470.31 4796.9,1588.39
Layer 2:
  rectangle net SD_CD_2: 2631.05,-214 2656.58,312.14
  rectangle net SD_CD_11: 3110.86,-215.43 3135.74,274.73
  rectangle net SD_CD_6: 3679.55,-215.43 3738.32,270.6
  region net SD_CD_10: 2129.04,1235 2097.5,1235 2097.5,687.98 2129.04,687.98
  region net SD_CD_10: 2135.9,739.69 2097.5,739.69 2097.5,687.94 2135.9,687.94
  region net SD_CD_4: 571.73,1244 521.73,1244 521.73,687.94 571.73,687.94
  region net SD_CD_4: 571.73,739.69 418.9,739.69 418.9,687.94 571.73,687.94
  region net SD_CD_9: 1171.73,1241 1121.73,1241 1121.73,687.94 1171.73,687.94
  region net SD_CD_9: 1171.73,739.69 1023.9,739.69 1023.9,687.94 1171.73,687.94
  region net SD_CD_5: 1771.73,1242 1721.73,1242 1721.73,687.94 1771.73,687.94
  region net SD_CD_5: 1771.73,739.69 1625.9,739.69 1625.9,687.94 1771.73,687.94
  rectangle net SD_CD_8: 45.96,85.62 75.77,615.67
  rectangle net SD_CD_8: 45.96,581 286.27,615.67
  rectangle net SD_CD_3: 636.58,82 686.58,615.67
  rectangle net SD_CD_3: 636.58,581.85 775.87,615.67
  rectangle net SD_CD_12: 1236.58,82.17 1286.58,615.67
  rectangle net SD_CD_12: 1237,581.18 1363.9,615.67
  rectangle net SD_CD_7: 1839,582 1970.9,615.67
  rectangle net SD_CD_7: 1838.04,82.17 1888.04,615.67
  pour cut-out: 4491.9,1588.31 4491.9,1470.31 4796.9,1470.31 4796.9,1588.39
Bottom Layer:
  rectangle net GND: 4789.37,1245.15 4914.37,1329.45
  rectangle net 3V: 4789.37,1341.78 4914.37,1439.79
  pour cut-out: 4491.9,1588.31 4491.9,1470.31 4796.9,1470.31 4796.9,1588.39

## Silkscreen, mask and mechanical layers (free items; w line width, h text height)
Top Overlay:
  lines w5: 2699.91,436.09 2727.78,408.22 2768.55,408.22 2768.55,425.76 ; 2933.66,369.5 2933.66,408.22 2936.89,411.45 ; 3800.69,440.48 3865.17,440.48 3866.87,438.78 3866.87,406.68 3863.43,403.24 ; 3928.89,418.77 3928.89,404.24 3929.89,403.24 4048.16,403.24 4059.63,391.78 ; 3968.26,418.78 4058.35,418.78 4059.63,420.05 ; 4017.31,342.78 4062.12,342.78 ; 4397,1114.28 4499.64,1114.28 4518.15,1132.8 ; 4401.7,1173.3 4401.67,1173.3 4415.94,1159.03 4429.19,1159.03 ; 4425.36,1011.52 4603.87,1011.52
  text "V.1.2.0" at 2791.07,1542.78 h60
  text "MIC" at 4805.5,1482.31 h60
Bottom Overlay:
  text "VBAT" at 3872.67,1351.71 h60 r270
  text "GND" at 3766.94,1346.71 h60 r270
  text "3V" at 4772.4,1344.5 h60
  text "GND" at 4772.4,1244.5 h60
  text "IO4" at 4772.4,1144.5 h60
  text "IO3" at 4772.4,1044.5 h60
  text "IO2" at 4772.4,944.5 h60
  text "IO1" at 4772.4,841.5 h60
  text "3V" at 4219.6,-144.75 h60 r270
  text "SWDIO" at 4325.92,-144.75 h60 r270
  text "SWCLK" at 4416.06,-144.75 h60 r270
  text "SWO" at 4521.59,-144.75 h60 r270
  text "RST" at 4622.09,-144.75 h60 r270
  text "GND" at 4722.81,-144.75 h60 r270
Board Cutout:
  lines w7.87: 0,0 -0.1,1302.76 2362.1,1302.76 2362.1,1518.5 cw(c2442.42,1516.92) 2443.99,1597.24 ; 0.4,0 2362.61,0 2362.61,-215.75 ccw(c2442.92,-214.17) 2444.5,-294.49 4841.65,-294.49 ccw(c4843.03,-216.34) 4921.18,-217.72 4924.31,1518.5 ccw(c4846.16,1517.12) 4844.78,1595.27 3643.32,1595.27 3586.23,1538.18 3188.59,1538.18 3129.53,1597.24 2444.5,1597.24
Fabrication:
  drawing of 295 lines, arcs and shapes, not listed
  text "Layer" at 5508.5,1982 h60
  text "Name" at 5918.41,1982 h60
  text "Material" at 6848.16,1982 h60
  text "Thickness" at 7707.92,1982 h60
  text "Constant" at 8357.76,1982 h60
  text "Board Layer Stack" at 8927.62,1982 h60
  text "Top Overlay" at 5918.41,1862 h60
  text "Top Solder" at 5918.41,1742 h60
  text "Solder Resist" at 6848.16,1742 h60
  text "0.020mm" at 7707.92,1742 h60
  text "3.5" at 8357.76,1742 h60
  text "1" at 5508.5,1622 h60
  text "Top Layer" at 5918.41,1622 h60
  text "0.035mm" at 7707.92,1622 h60
  text "Dielectric 2" at 5918.41,1502 h60
  text "PP-006" at 6848.16,1502 h60
  text "0.203mm" at 7707.92,1502 h60
  text "4.1" at 8357.76,1502 h60
  text "2" at 5508.5,1382 h60
  text "Layer 1" at 5918.41,1382 h60
  text "CF-004" at 6848.16,1382 h60
  text "0.030mm" at 7707.92,1382 h60
  text "Dielectric 1" at 5918.41,1262 h60
  text "FR-4" at 6848.16,1262 h60
  text "1.030mm" at 7707.92,1262 h60
  text "4.8" at 8357.76,1262 h60
  text "3" at 5508.5,1142 h60
  text "Layer 2" at 5918.41,1142 h60
  text "CF-004" at 6848.16,1142 h60
  text "0.030mm" at 7707.92,1142 h60
  text "Dielectric 3" at 5918.41,1022 h60
  text "PP-006" at 6848.16,1022 h60
  text "0.203mm" at 7707.92,1022 h60
  text "4.1" at 8357.76,1022 h60
  text "4" at 5508.5,902 h60
  text "Bottom Layer" at 5918.41,902 h60
  text "0.035mm" at 7707.92,902 h60
  text "Bottom Solder" at 5918.41,782 h60
  text "Solder Resist" at 6848.16,782 h60
  text "0.020mm" at 7707.92,782 h60
  text "3.5" at 8357.76,782 h60
  text "Bottom Overlay" at 5918.41,662 h60
  text "Total board thickness:" at 5508.5,542 h60
  text "1.606mm" at 7707.92,542 h60
Drill Drawing:
  circle w10: c127.62,3256.28 r33.33
  lines w10: 94.29,2622.94 127.62,2639.61 160.96,2622.94 144.29,2656.28 160.96,2689.61 127.62,2672.94 94.29,2689.61 110.96,2656.28 94.29,2622.94 ; 94.29,2772.94 160.96,2772.94 160.96,2839.61 94.29,2839.61 94.29,2772.94 ; 94.29,2939.61 110.96,2939.61 127.62,2922.94 144.29,2939.61 160.96,2939.61 144.29,2956.28 160.96,2972.94 144.29,2972.94 127.62,2989.61 110.96,2972.94 94.29,2972.94 110.96,2956.28 94.29,2939.61 ; 94.29,3139.61 160.96,3139.61 127.62,3072.94 94.29,3139.61
  lines w15: 34.5,2577.94 11365.32,2577.94 ; 34.5,3327.94 11365.32,3327.94 ; 585.38,2427.94 585.38,3477.94 ; 1185.22,2427.94 1185.22,3477.94 ; 2284.9,2427.94 2284.9,3477.94 ; 2790.77,2427.94 2790.77,3477.94 ; 3524.57,2427.94 3524.57,3477.94 ; 5024.13,2427.94 5024.13,3477.94 ; 5613.97,2427.94 5613.97,3477.94 ; 6359.77,2427.94 6359.77,3477.94 ; 7799.34,2427.94 7799.34,3477.94 ; 8653.11,2427.94 8653.11,3477.94 ; 9986.71,2427.94 9986.71,3477.94 ; 34.5,2427.94 11365.32,2427.94 11365.32,3477.94 34.5,3477.94 34.5,2427.94
  text "Symbol" at 124.5,3372.94 h72
  text "Count" at 630.38,3372.94 h72
  text "Hole Size" at 1230.22,3372.94 h72
  text "Plated" at 2329.9,3372.94 h72
  text "Hole Type" at 2835.77,3372.94 h72
  text "Drill Layer Pair" at 3569.57,3372.94 h72
  text "Via/Pad" at 5069.13,3372.94 h72
  text "Pad Shape" at 5658.97,3372.94 h72
  text "Template" at 6404.77,3372.94 h72
  text "Description" at 7844.34,3372.94 h72
  text "Hole Tolerance (+)" at 8698.11,3372.94 h72
  text "Hole Tolerance (-)" at 10031.71,3372.94 h72
  text "2" at 630.38,3222.94 h60
  text "23.62mil (0.600mm)" at 1230.22,3222.94 h60
  text "PTH" at 2329.9,3222.94 h60
  text "Slot" at 2835.77,3222.94 h60
  text "Top Layer - Bottom Layer" at 3569.57,3222.94 h60
  text "Pad" at 5069.13,3222.94 h60
  text "Rounded" at 5658.97,3222.94 h60
  text "r190_120h60_130r60m0mx0" at 6404.77,3222.94 h60
  text "2" at 630.38,3072.94 h60
  text "33.47mil (0.850mm)" at 1230.22,3072.94 h60
  text "PTH" at 2329.9,3072.94 h60
  text "Round" at 2835.77,3072.94 h60
  text "Top Layer - Bottom Layer" at 3569.57,3072.94 h60
  text "Pad" at 5069.13,3072.94 h60
  text "Rounded" at 5658.97,3072.94 h60
  text "c145h85m158" at 6404.77,3072.94 h60
  text "2" at 630.38,2922.94 h60
  text "39.37mil (1.000mm)" at 1230.22,2922.94 h60
  text "PTH" at 2329.9,2922.94 h60
  text "Round" at 2835.77,2922.94 h60
  text "Top Layer - Bottom Layer" at 3569.57,2922.94 h60
  text "Pad" at 5069.13,2922.94 h60
  text "Rounded" at 5658.97,2922.94 h60
  text "c160h100m170mx170p0" at 6404.77,2922.94 h60
  text "5" at 630.38,2772.94 h60
  text "35.43mil (0.900mm)" at 1230.22,2772.94 h60
  text "PTH" at 2329.9,2772.94 h60
  text "Round" at 2835.77,2772.94 h60
  text "Top Layer - Bottom Layer" at 3569.57,2772.94 h60
  text "Pad" at 5069.13,2772.94 h60
  text "(Mixed)" at 5658.97,2772.94 h60
  text "(Mixed)" at 6404.77,2772.94 h60
  text "349" at 630.38,2622.94 h60
  text "11.81mil (0.300mm)" at 1230.22,2622.94 h60
  text "PTH" at 2329.9,2622.94 h60
  text "Round" at 2835.77,2622.94 h60
  text "Top Layer - Bottom Layer" at 3569.57,2622.94 h60
  text "Via" at 5069.13,2622.94 h60
  text "Rounded" at 5658.97,2622.94 h60
  text "(Mixed)" at 6404.77,2622.94 h60
  text "360 Total" at 630.38,2472.94 h60
  text "Slot definitions :" at 124.5,2327.97 h60
  text "Routed Path Length" at 1157.19,2327.97 h60
  text "= Calculated from tool start centre position to tool end centre position." at 2259.86,2327.97 h60
  text "Hole Length" at 1157.19,2227.99 h60
  text "= Routed Path Length + Tool Size = Slot length as defined in the PCB layout" at 1849.99,2227.99 h60

## Dimensions
4841.65,-294.49 to 4844.78,1595.27 on Dimension
-0.1,1302.76 to 2362.1,1302.76 on Dimension
-0.1,1302.76 to 0.4,0 on Dimension
0,0 to 4921.18,-217.72 on Dimension

## Text inside footprints (layer, text, board x,y; h text height)
J3: Mechanical 13 "PCB Edge" at 2431.86,1589.36 h39.37 r180